# Altium PCB Inverter_540VDC.PcbDoc (part 2 of 2)
Units mm, origin at the board's own origin, x right, y up, seen from the top; angles counter-clockwise.
Board outline 400.26 x 240.24 mm, 2 copper layers (Top Layer, Bottom Layer), stack 2.071 mm thick; 193 components, 91 nets, 517 pads, 367 vias.
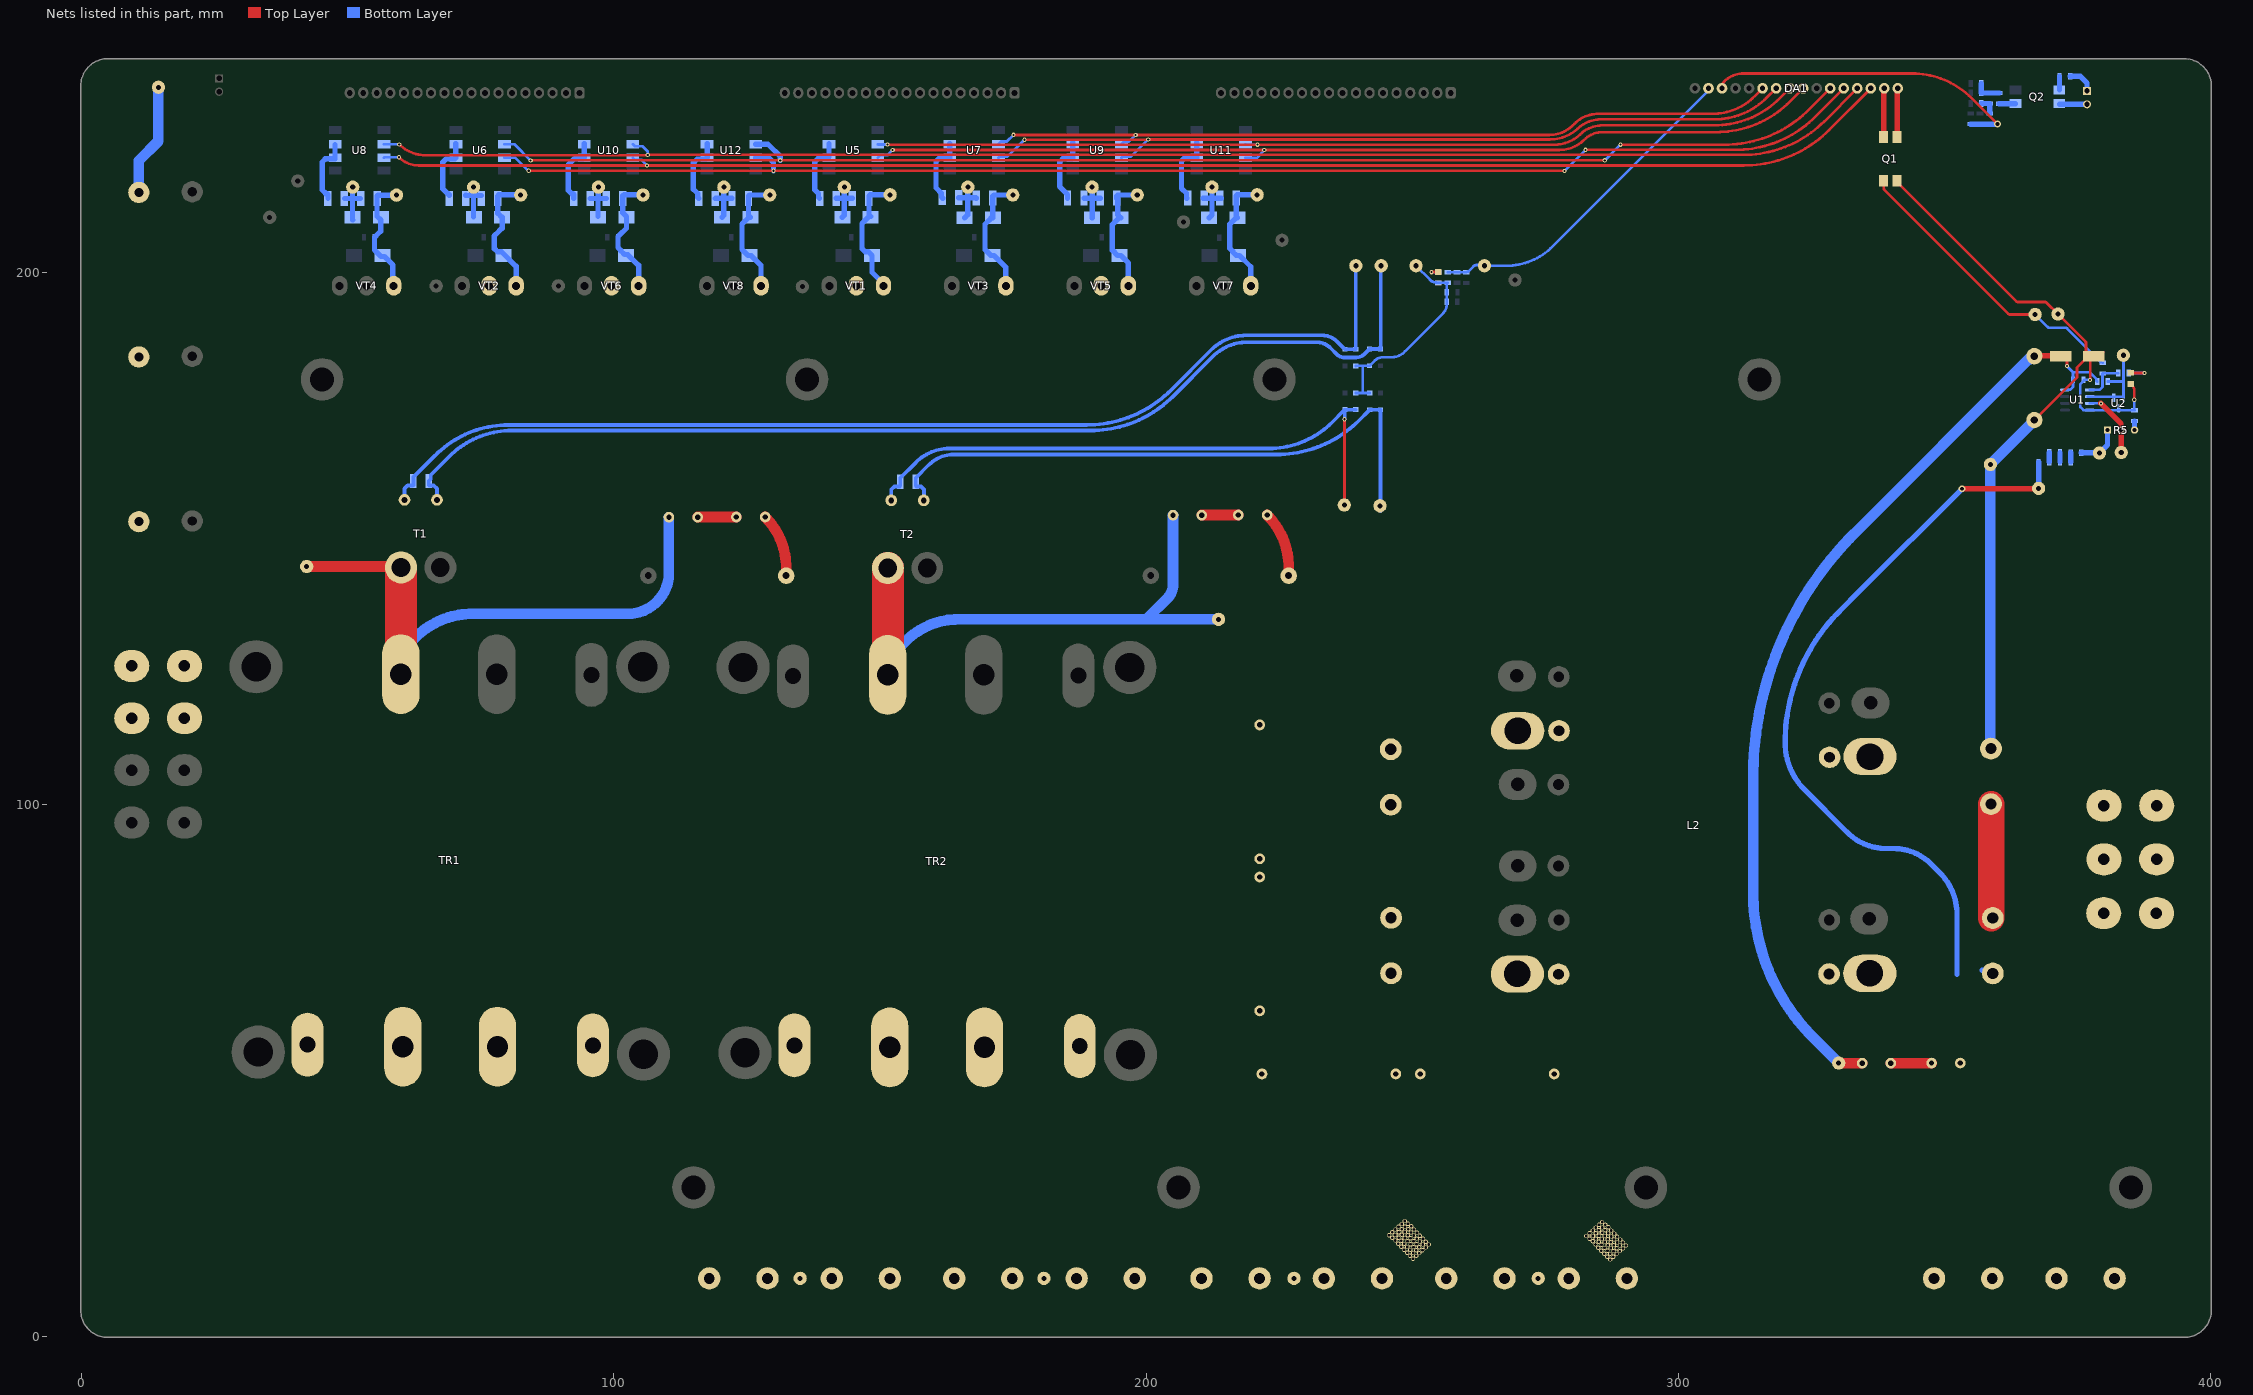
[diagram p2: the nets of this part, all layers, seen from the top]

## Via types
v1: diameter 0.8, hole 0.5, Top Layer to Bottom Layer, 324 vias
v2: diameter 0.8, hole 0.4, Top Layer to Bottom Layer, 37 vias
v3: diameter 1.27, hole 0.711, Top Layer to Bottom Layer, 6 vias

## Nets (pads, with @x,y where several pads share a name; then routed paths per layer and width w, separated by ;. In a path a pad name is that pad's centre, name@x,y a point inside that pad or via, vN(x,y) a via of type N, cw(c..) or ccw(c..) an arc to the next point about the centre after c; other vN are vias at no path point) (continued)
GND_II: C1.2 C2.1 C20.2 D1.2 L2.2 Q1.2 R7.2 TP8.1 TP9.1 U1.4 U2.3 VD1.2 VD5.1 | length 161.7
  Top Layer w0.5: Q1.2@341.163,216.862 341.67,216.355 363.455,194.57 ccw(c363.807,194.925) 363.805,194.425 368.843,194.425 cw(c368.843,193.925) 369.196,194.279 TP8.1@371.325,192.15 376.45,187.025 cw(c376.096,186.672) 376.596,186.672 376.596,184.995 C1.2@377.346,184.245 ; VD1.2@366.9,172.25 374.9,180.25 374.9,182.092 377.053,184.245 C1.2@377.346,184.245 ; v2(377.35,179.75) 377.35,183.795 C1.2@377.8,184.245 ; C1.2@379.82,184.995 378.803,184.995 C1.2@378.053,184.245 C1.2@377.8,184.245 ; D1.2@384.955,179.02 385.305,178.72 385.463,178.474 cw(c384.46,177.825) 385.655,177.825 385.655,177.475 v2(385.655,176.045) ; C1.2@377.346,184.245 C1.2@377.8,184.245
  Bottom Layer w0.5: C20.2@358.687,110.552 C20.2@358.725,110.514 ; C2.1@376.13,179.595 375.525,178.99 375.525,174.675 376.095,174.105 382.656,174.105 U2.3@382.715,174.164 ; C2.1@376.218,179.732 376.27,179.785 377.315,179.785 v2(377.35,179.75) ; U2.3@382.774,174.07 R7.2@385.68,174.07 385.668,174.083 385.668,176.032 v2(385.655,176.045)
  Bottom Layer w2: C20.2@358.625,110.614 TP9.1@358.625,163.9 366.9,172.175 VD1.2@366.9,172.25
NetC1_1: C1.1 C2.2 R2.2 R3.1 TP1.1 U1.8 VD1.1 | length 181.5
  Top Layer w0.5: TP1.1@330.125,51.45 TP1.1@330.137,51.438 ; R3.1@334.512,51.438 R3.1@334.525,51.425 ; C1.1@371.78,184.295 C1.1@371.83,184.245 372.25,184.245 373,183.495 v2(373,182.4)
  Top Layer w1: VD1.1@366.105,184.295 C1.1@371.78,184.295
  Top Layer w2: TP1.1@330.137,51.438 R3.1@334.512,51.438
  Bottom Layer w0.5: U1.8@372.654,177.915 372.662,177.923 373.599,177.923 374.13,178.454 C2.2@374.13,179.82 374.13,181.22 ; v2(373,182.4) 373,182.35 374.13,181.22 ; R2.2@378.68,179.47 378.53,179.62 378.53,179.92 377.23,181.22 374.13,181.22
  Bottom Layer w2: TP1.1@330.125,51.45 325.385,56.19 cw(c352.727,83.546) 314.05,83.546 314.05,104.968 cw(c379.13,104.968) 333.114,150.989 365.825,183.7 366.129,183.7 366.679,184.25 VD1.1@366.9,184.25
NetC17_1: C17.1 C18.2 C21.1 C22.2 C23.1 C27.2 J2.1 TR1.6 TR1.7 TR2.6 TR2.7
NetC17_2: C17.2 C18.1 C23.2 L2.8 VD3.1 VD6.1 VD8.1 VD10.1
  other v1: 250.15,14.7 250.75,15.225 249.575,15.25 251.35,15.75 250.175,15.775 249.05,15.825 250.775,16.3 251.925,16.3 249.65,16.35 248.475,16.375 252.55,16.8 251.35,16.85 250.25,16.875 249.075,16.9 247.925,16.95 251.975,17.35 253.125,17.35 249.675,17.425 250.825,17.425 248.525,17.475 247.375,17.525 252.55,17.9 251.45,17.925 250.25,17.975 249.125,18 247.975,18.05 246.85,18.125 250.875,18.475 252.025,18.475 249.7,18.55 248.575,18.575 246.25,18.625 247.45,18.65 251.45,19.025 250.325,19.05 245.65,19.125 249.15,19.125 246.85,19.15 248.05,19.175 250.9,19.6 249.775,19.625 246.25,19.65 247.45,19.675 248.625,19.725 246.85,20.175 250.35,20.175 248.025,20.225 249.25,20.225 247.425,20.725 248.65,20.725 249.825,20.775 248.05,21.225 249.225,21.275 248.625,21.775
NetC19_2: C19.2 C20.1 | length 21.5
  Top Layer w5: C19.2@358.787,78.695 C20.1@358.787,100.038
  Bottom Layer w1: C20.1@358.725,100.1 C20.1@358.787,100.038 ; C19.2@359.012,78.763 C19.2@359.075,78.7
NetC21_2: C21.2 C22.1 C27.1 L2.6 VD4.3 VD7.3 VD9.3 VD11.3
  other v1: 287.2,14.525 286.625,15.075 287.8,15.05 288.4,15.575 287.225,15.6 286.1,15.65 287.825,16.125 288.975,16.125 286.7,16.175 285.525,16.2 289.6,16.625 288.4,16.675 287.3,16.7 286.125,16.725 284.975,16.775 289.025,17.175 290.175,17.175 286.725,17.25 287.875,17.25 285.575,17.3 284.425,17.35 289.6,17.725 288.5,17.75 287.3,17.8 286.175,17.825 285.025,17.875 283.9,17.95 287.925,18.3 289.075,18.3 286.75,18.375 285.625,18.4 283.3,18.45 284.5,18.475 288.5,18.85 287.375,18.875 282.7,18.95 286.2,18.95 283.9,18.975 285.1,19 287.95,19.425 286.825,19.45 283.3,19.475 284.5,19.5 285.675,19.55 283.9,20 287.4,20 285.075,20.05 286.3,20.05 284.475,20.55 285.7,20.55 286.875,20.6 285.1,21.05 286.275,21.1 285.675,21.6
NetC28_2: C28.2 DA1.3 R30.2 R37.2 | length 61.4
  Top Layer w0.5: DA1.3@308.213,234.551 DA1.3@308.205,234.55 308.2,234.711 cw(c309.817,234.759) 308.695,235.925 cw(c312.25,232.205) 312.25,237.35 343.913,237.35 cw(c343.913,221.568) 355.074,232.726 v3(359.95,227.85)
  Bottom Layer w0.5: R37.2@354.939,227.85 R37.2@354.951,227.838 ; R30.2@358.462,227.838 R30.2@358.475,227.825 R30.2@358.487,227.837 ; v3@359.937,227.837 v3(359.95,227.85)
  Bottom Layer w1: R37.2@354.951,227.838 R30.2@358.462,227.838 ; R30.2@358.487,227.837 v3@359.937,227.837
NetC29_2: C29.2 R31.1 R32.2 R38.1 | length 5.2
  Bottom Layer w1: C29.2@356.925,235.475 R38.1@356.925,233.7 356.938,233.688 360.288,233.688 R32.2@360.3,233.675
NetC30_2: C30.2 R30.1 R31.2 | length 3.5
  Bottom Layer w1: C30.2@356.925,231.7 R31.2@358.5,231.7 358.487,231.687 358.487,229.838 R30.1@358.475,229.825
NetC31_1: C31.1 R8.2 | length 12.5
  Top Layer w2: R8.2@222.75,154.4 222.756,154.394 cw(c212.963,144.613) 226.804,144.613 C31.1@226.804,143
NetC32_1: C32.1 R9.2 | length 12.1
  Top Layer w2: R9.2@128.45,154.025 128.455,154.02 cw(c118.904,144.479) 132.404,144.479 C32.1@132.404,143
NetC33_1: C33.1 C34.1 D8.2 D12.2 D14.2 D16.2 R55.1 R58.2 TP47.1 | length 41.2
  Bottom Layer w0.5: D16.2@239.375,177.35 D16.2@239.4,177.35 239.413,177.338 240.713,177.338 ; D12.2@239.4,182.4 239.412,182.413 240.7,182.413 ; D8.2@242,182.425 242.025,182.425 242.225,182.625 242.225,182.65 242.992,183.417 cw(c244.46,181.95) 244.46,184.025 245.979,184.025 245.981,184.025 ccw(c245.981,187.813) 248.661,185.136 255.716,192.191 ccw(c253.827,194.082) 256.5,194.075 256.5,194.45 C34.1@256.5,196.25 ; D8.2@242.013,182.413 240.7,182.413 ; D14.2@242.05,177.325 D14.2@242.025,177.325 242.013,177.338 240.713,177.338 ; TP47.1@250.725,201.225 253.319,198.631 253.466,198.484 ccw(c254.423,199.442) 254.422,198.087 254.55,198.088 R58.2@254.925,198.025 R55.1@256.625,198.025 ; C34.1@256.475,196.25 256.475,197.875 R55.1@256.625,198.025 ; R55.1@256.675,198.025 R55.1@256.625,198.025 ; 240.7,182.413 240.7,177.35 240.713,177.338
NetC35_2: C35.2 DA1.2 R55.2 R59.2 TP48.1 | length 62.4
  Bottom Layer w0.5: R55.2@256.675,200.025 256.688,200.013 258.425,200.013 260.163,200.013 R59.2@260.175,200 260.55,200.15 261.512,201.112 cw(c262.158,200.465) 262.158,201.379 TP48.1@263.465,201.379 ; TP48.1@263.575,201.225 267.66,201.225 267.661,201.225 ccw(c267.661,213.547) 276.375,204.835 DA1.2@305.615,234.075
NetD1_1: D1.1 R6.2 | length 5.6
  Top Layer w0.5: D1.1@384.955,181.12 384.98,181.095 387.53,181.095 v2@387.555,181.07
  Bottom Layer w0.5: R6.2@384.63,181.07 384.643,181.082 387.568,181.082 v2(387.58,181.095)
NetD3_1: D3.1 R28.2 R33.2 TP26.1 | length 8.9
  Bottom Layer w1: R33.2@141.776,213.9 143.312,213.9 ; D3.1@142.944,210.325 143.312,210.694 143.312,213.9 ; TP26.1@143.325,216 143.312,215.988 143.312,213.9 ; R28.2@144.849,213.9 143.312,213.9
NetD3_2: D3.2 R28.1 R34.2 TP27.1 VD12.1 VT1.1 | length 23.8
  Bottom Layer w1: VD12.1@148.534,202.95 148.534,200 150.68,197.854 VT1.1@150.68,197.454 ; VD12.1@148.534,203.15 147.834,203.85 147.236,203.85 146.65,204.436 R34.2@146.65,206.575 146.65,209.147 147.978,210.475 148.278,210.475 147.951,210.802 147.951,214.348 148.153,214.55 TP27.1@151.925,214.55
NetD4_1: D4.1 R29.2 R35.2 TP28.1 | length 8.6
  Bottom Layer w1: R35.2@72.201,214.45 72.213,214.437 73.663,214.437 ; D4.1@73.663,210.378 73.663,214.437 ; TP28.1@73.675,216 73.663,215.988 73.663,214.437 ; R29.2@75.124,214.425 75.112,214.437 73.663,214.437
NetD4_2: D4.2 R29.1 R36.2 TP29.1 VD13.1 VT2.1 | length 25.9
  Bottom Layer w1: R36.2@77.575,206.7 R36.2@77.575,206.575 77.575,204.436 78.161,203.85 78.934,203.85 81.68,201.104 VT2.1@81.68,197.454 ; R36.2@77.575,206.825 77.675,206.925 77.675,206.95 77.775,207.05 77.8,207.05 79.036,208.286 79.036,210.386 79.05,210.4 78.926,210.4 78.226,211.1 78.226,214.348 78.428,214.55 82.244,214.55 TP29.1@82.925,214.55 ; TP29.1@82.244,214.263 81.981,214 TP29.1@82.781,214
NetD5_1: D5.1 R39.2 R41.2 TP31.1 | length 9.4
  Bottom Layer w1: R41.2@164.799,214.026 164.85,213.976 166.513,213.976 ; D5.1@165.916,210.225 166.513,210.822 166.513,213.976 ; TP31.1@166.525,216 166.513,215.988 166.513,213.976 ; R39.2@168.124,213.925 168.074,213.976 166.513,213.976
NetD5_2: D5.2 R39.1 R42.2 TP30.1 VD14.2 VT3.1 | length 23.4
  Bottom Layer w1: R39.1@171.226,213.925 171.238,213.913 171.238,210.237 D5.2@171.25,210.225 170.95,210.225 169.75,209.025 169.75,204.25 170.85,203.15 171.45,203.15 173.68,200.92 VT3.1@173.68,197.454 ; R39.1@171.226,214.036 171.226,214.323 171.428,214.525 TP30.1@174.975,214.525
NetD6_1: D6.1 R40.2 R43.2 TP33.1 | length 9.2
  Bottom Layer w1: R43.2@49.426,213.875 50.938,213.875 ; D6.1@50.969,209.825 50.938,209.856 50.938,213.875 ; TP33.1@50.975,216 50.938,215.962 50.938,213.875 ; R40.2@52.449,213.875 50.938,213.875
NetD6_2: D6.2 R40.1 R44.2 TP32.1 VD15.2 VT4.1 | length 23.2
  Bottom Layer w1: D6.2@56.251,209.825 55.551,210.525 55.551,214.298 55.753,214.5 TP32.1@59.2,214.5 ; D6.2@56.303,209.825 56.211,209.733 56.211,207.711 55.3,206.8 55.275,206.8 55.175,206.7 55.175,206.675 R44.2@55.075,206.575 55.075,204.2 56.325,202.95 56.925,202.95 58.508,201.367 58.508,197.626 VT4.1@58.68,197.454
NetD7_2: D7.2 D8.1 R45.2 T1.3 TP34.1 | length 209.8
  Bottom Layer w0.7: T1.3@66.798,157.25 66.798,159.361 66.212,159.947 65.378,159.947 65.276,160.049 R45.2@65.276,160.8 65.628,161.152 65.628,161.928 69.107,165.407 cw(c80.858,153.658) 80.858,170.275 189.586,170.275 189.587,170.275 ccw(c189.587,192.154) 205.06,176.685 212.556,184.181 cw(c219.057,177.683) 219.057,186.875 231.953,186.875 231.957,186.875 cw(c231.956,182.966) 234.719,185.731 234.722,185.728 235.875,184.575 235.877,184.572 ccw(c237.26,185.955) 237.26,184 237.261,184 239.453,184 239.455,184 ccw(c239.455,186.281) 241.068,184.668 241.775,185.375 D8.1@242,185.575 D7.2@244.05,185.575 244.113,185.638 TP34.1@244.113,201.225
NetD9_1: D9.1 R46.2 R48.2 TP37.1 | length 9.2
  Bottom Layer w1: R48.2@188.351,213.925 189.875,213.925 ; TP37.1@189.875,216.35 189.875,213.925 ; D9.1@189.891,210.225 189.875,210.241 189.875,213.925 ; R46.2@191.399,213.925 189.875,213.925
NetD9_2: D9.2 R46.1 R50.2 TP38.1 VD16.2 VT5.1 | length 23.4
  Bottom Layer w1: R46.1@194.5,213.925 194.702,213.723 194.702,210.748 D9.2@195.225,210.225 194.925,210.225 193.675,208.975 R50.2@193.675,206.55 193.675,204.153 194.678,203.15 VD16.2@194.978,203.15 195.278,203.15 196.68,201.748 VT5.1@196.68,197.454 ; R46.1@194.5,214.036 194.5,214.323 194.702,214.525 TP38.1@198.35,214.525
NetD10_1: D10.1 R47.2 R51.2 TP39.1 | length 9
  Bottom Layer w1: R51.2@95.626,213.875 97.066,213.875 ; D10.1@97.066,210.475 97.066,213.875 ; TP39.1@97.125,216.45 97.125,213.934 97.066,213.875 ; R47.2@98.624,213.875 97.066,213.875
NetD10_2: D10.2 R47.1 R53.2 TP40.1 VD17.2 VT6.1 | length 23.6
  Bottom Layer w1: R53.2@100.8,206.675 R53.2@100.8,206.575 100.8,204.65 101.328,204.122 101.328,204.05 102.028,203.35 102.628,203.35 104.68,201.298 VT6.1@104.68,197.454 ; R53.2@100.8,206.7 101.668,207.568 101.693,207.568 102.4,208.275 D10.2@102.4,210.325 102.4,210.475 101.725,211.15 101.725,214.37 101.927,214.573 TP40.1@105.463,214.573
NetD11_2: D11.2 D12.1 R45.1 T1.4 TP41.1 | length 208
  Bottom Layer w0.7: T1.4@60.702,157.25 60.702,159.361 61.288,159.947 62.272,159.947 62.374,160.049 R45.1@62.374,160.8 62.374,161.551 62.727,161.903 62.753,161.903 66.454,165.604 cw(c80.264,151.796) 80.264,171.325 80.266,171.325 188.849,171.325 188.85,171.325 ccw(c188.85,193.777) 204.727,177.902 212.261,185.436 cw(c218.811,178.89) 218.811,188.15 233.132,188.15 cw(c233.13,184.238) 235.898,187.002 237.125,185.775 237.125,185.75 237.325,185.55 D11.2@237.35,185.55 D12.1@239.4,185.55 TP41.1@239.4,201.225
NetD13_2: D13.2 D14.1 R54.2 T2.3 TP42.1 | length 115.8
  Bottom Layer w0.7: T2.3@158.248,157.15 158.313,157.215 158.313,159.186 157.727,159.772 156.853,159.772 156.751,159.874 R54.2@156.751,160.625 156.751,161.376 159.201,163.826 cw(c163.904,159.126) 163.904,165.775 224.544,165.775 ccw(c224.544,187.698) 224.546,165.775 ccw(c224.544,187.698) 240.048,172.198 241.8,173.95 241.8,173.975 242,174.175 D14.1@242.025,174.175 D13.2@244.075,174.175 ; TP42.1@244.05,155.15 D13.2@244.05,174.15
NetD15_2: D15.2 D16.1 R54.1 T2.4 TP53.1 | length 112.9
  Top Layer w0.5: TP53.1@237.3,156.275 v2@237.3,172.375
  Bottom Layer w0.7: T2.4@152.152,157.15 152.152,159.186 152.738,159.772 153.747,159.772 153.849,159.874 R54.1@153.849,160.625 153.849,161.376 156.765,164.291 cw(c163.061,157.997) 163.061,166.9 223.078,166.9 223.08,166.9 ccw(c223.08,183.727) 234.98,171.83 D15.2@237.125,173.975 ; v2(237.275,172.4) 237.312,172.438 237.312,173.975 237.312,174.188 237.325,174.2 D15.2@237.35,174.2 D16.1@239.4,174.2
NetD17_1: D17.1 R56.2 R60.2 TP49.1 | length 10
  Bottom Layer w1: R60.2@210.751,213.925 212.4,213.925 ; D17.1@211.866,210.225 212.4,210.759 212.4,213.925 ; TP49.1@212.4,216.625 212.4,213.925 ; R56.2@214.124,213.925 R56.2@213.824,213.925 212.4,213.925
NetD17_2: D17.2 R56.1 R61.2 TP50.1 VD18.2 VT7.1 | length 23.8
  Bottom Layer w1: VT7.1@219.68,197.454 219.68,201.045 217.575,203.15 216.975,203.15 216.275,203.85 216.275,203.95 215.75,204.475 R61.2@215.75,206.5 215.75,209.075 216.9,210.225 D17.2@217.2,210.225 216.926,210.499 216.926,214.348 217.128,214.55 TP50.1@220.875,214.55
NetD18_1: D18.1 R57.2 R62.2 TP51.1 | length 9
  Bottom Layer w1: R62.2@119.101,213.875 119.113,213.887 120.675,213.887 ; D18.1@120.344,210.325 120.675,210.656 120.675,213.887 ; TP51.1@120.7,216 120.675,215.975 120.675,213.887 ; R57.2@122.224,213.9 122.212,213.887 120.675,213.887
NetD18_2: D18.2 R57.1 R63.2 TP52.1 VD19.2 VT8.1 | length 23.8
  Bottom Layer w1: VT8.1@127.68,197.454 127.68,201.298 125.828,203.15 VD19.2@125.528,203.15 125.228,203.15 124.1,204.278 R63.2@124.1,206.575 124.1,209.047 125.378,210.325 D18.2@125.678,210.325 125.326,210.677 125.326,214.323 125.528,214.525 TP52.1@129.325,214.525
NetD19_1: D19.1 R58.1 | length 2.6
  Top Layer w0.5: v2(253.65,200.025) 253.675,200.05 254.9,200.05 D19.1@254.925,200.075
  Bottom Layer w0.5: v2(253.65,200.025) R58.1@254.925,200.025
NetDA1_6: DA1.6 U7.2 U9.2 | length 150.3
  Top Layer w0.5: v2(175.1,225.825) 175.125,225.8 v2(198.05,225.8) 275.792,225.8 ccw(c275.794,232.032) 280.202,227.627 280.455,227.88 cw(c285.026,223.314) 285.026,229.775 306.363,229.775 306.365,229.775 ccw(c306.365,241.086) 314.364,233.089 DA1.6@315.825,234.55
  Bottom Layer w0.5: U7.2@172.272,224.053 172.784,224.565 173.84,224.565 v2(175.1,225.825) ; U9.2@195.397,224.053 195.909,224.565 196.815,224.565 v2(198.05,225.8)
NetDA1_7: DA1.7 U7.3 U9.3 | length 156.7
  Top Layer w0.5: v2(177.175,224.9) 200.375,224.9 v2(200.425,224.95) 275.824,224.95 ccw(c275.826,232.846) 281.408,227.262 cw(c283.47,225.202) 281.85,227.625 cw(c285.222,222.582) 282.901,228.187 cw(c285.732,221.353) 285.733,228.75 306.849,228.75 306.851,228.75 ccw(c306.851,242.545) 316.607,232.792 DA1.7@318.365,234.55
  Bottom Layer w0.5: U7.3@172.272,221.513 172.438,221.679 173.929,221.679 177.15,224.9 v2(177.175,224.9) ; U9.3@195.397,221.513 195.563,221.679 197.129,221.679 200.4,224.95 v2(200.425,224.95)
NetDA1_8: DA1.8 U5.2 U11.2 | length 176.7
  Top Layer w0.5: v2(151.425,224) 151.45,223.975 v2(220.95,223.975) 220.975,223.95 276.486,223.95 ccw(c276.488,231.599) 281.895,226.189 cw(c284.612,223.477) 283.145,227.024 cw(c286.167,219.722) 286.167,227.625 306.86,227.625 306.861,227.625 ccw(c306.861,244.811) 319.015,232.66 DA1.8@320.905,234.55
  Bottom Layer w0.5: U5.2@149.597,224.053 149.65,224 v2(151.425,224) ; U11.2@218.675,224.053 218.753,223.975 v2(220.95,223.975)
NetDA1_9: DA1.9 U5.3 U11.3 | length 182.1
  Top Layer w0.5: v2(152.4,222.95) 152.425,222.975 v2(222.2,222.975) 277.667,222.975 277.669,222.975 ccw(c277.669,229.569) 282.332,224.907 cw(c285.754,221.486) 285.754,226.325 307.072,226.325 307.073,226.325 ccw(c307.073,245.993) 320.982,232.087 DA1.9@323.445,234.55
  Bottom Layer w0.5: U5.3@149.597,221.513 150.109,222.025 151.475,222.025 v2(152.4,222.95) ; U11.3@218.675,221.513 220.813,221.513 222.2,222.9 v2(222.2,222.975)
NetDA1_11: DA1.11 U6.2 U12.2 | length 261.2
  Top Layer w0.5: v2(84.4,221) 84.425,221.025 v2(286.175,221.025) ; v2(289.125,223.975) 308.67,223.975 ccw(c308.67,246.378) 324.514,230.539 DA1.11@328.525,234.55
  Bottom Layer w0.5: U6.2@79.497,224.053 81.322,224.053 84.375,221 v2(84.4,221) ; v2(286.175,221.025) v2(289.125,223.975)
  Bottom Layer w1: U12.2@126.697,224.053 128.972,224.053 131.3,221.725 v2(131.3,221.025)
NetDA1_12: DA1.12 U6.3 U12.3 | length 263.3
  Top Layer w0.5: v2(84.05,219.075) v2(130.025,219.075) 130.05,219.05 v2(278.6,219.05) ; v2(282.575,223) 310.705,223 ccw(c310.705,244.268) 325.746,229.231 DA1.12@331.065,234.55
  Bottom Layer w0.5: U6.3@79.497,221.513 81.531,221.513 83.344,219.7 83.969,219.075 v2(84.05,219.075) ; v2(278.6,219.05) 278.625,219.05 v2(282.575,223)
  Bottom Layer w1: U12.3@126.697,221.513 129.137,221.513 130.025,220.625 v2(130.025,219.075)
NetDA1_13: DA1.13 U8.2 U10.2 | length 285.5
  Top Layer w0.5: v2(59.725,224.025) ccw(c64.614,228.914) 64.614,222 64.615,222 v2@106.35,222 ; v2(106.4,222.05) 312.175,222.05 ccw(c312.177,243.604) 327.422,228.367 DA1.13@333.605,234.55
  Bottom Layer w0.5: U8.2@56.85,224.053 56.878,224.025 v2(59.725,224.025) ; U10.2@103.597,224.053 103.971,223.679 105.396,223.679 106.399,222.676 v2(106.4,222.05)
NetDA1_14: DA1.14 U8.3 U10.3 | length 288
  Top Layer w0.5: v2(59.65,221.6) ccw(c63.332,225.282) 63.332,220.075 63.333,220.075 v2(106.275,220.075) 312.282,220.075 312.284,220.075 ccw(c312.284,242.736) 328.309,226.714 DA1.14@336.145,234.55
  Bottom Layer w0.5: U8.3@56.85,221.513 56.937,221.6 v2(59.65,221.6) ; U10.3@103.597,221.513 103.988,221.122 105.228,221.122 v2(106.275,220.075)
NetDA1_15: DA1.15 Q1.4 | length 9.7
  Top Layer w0.5: DA1.15@338.685,234.34 DA1.15@338.685,234.55
  Top Layer w1: Q1.4@338.605,225.1 338.605,234.47 DA1.15@338.685,234.55
NetDA1_16: DA1.16 Q1.3 | length 9.2
  Top Layer w1: Q1.3@341.145,225.4 341.145,234.47 DA1.16@341.225,234.55
NetJ1_1: J1.1 VD2.1
NetJ3_1: J3.1 VD5.3
NetP1_1: P1.1 R27.1 | length 5.2
  Bottom Layer w1: R27.1@373.6,236.8 375.55,236.8 376.775,235.575 P1.1@376.775,234.095
NetP1_2: P1.2 Q2.2 | length 5.3
  Bottom Layer w0.5: Q2.2@371.55,231.68 Q2.2@371.675,231.555
  Bottom Layer w1: Q2.2@371.675,231.555 P1.2@376.775,231.555
NetQ1_1: Q1.1 R4.1 TP4.1 | length 56.1
  Top Layer w0.5: Q1.1@338.605,217.2 338.605,215.777 ccw(c339.105,215.777) 338.751,215.424 361.955,192.22 ccw(c362.307,192.575) 362.305,192.075 TP4.1@367.025,192.075
  Bottom Layer w0.5: TP4.1@367.025,192.075 369.379,189.721 369.38,189.72 ccw(c369.732,190.075) 369.732,189.575 372.693,189.575 cw(c372.693,189.075) 373.046,189.429 379.33,183.145 R4.1@379.705,182.995
NetQ2_1: Q2.1 R27.2 | length 2.6
  Bottom Layer w0.5: Q2.1@371.55,234.22 Q2.1@371.6,234.27
  Bottom Layer w1: Q2.1@371.6,234.27 R27.2@371.6,236.8
NetQ2_3: Q2.3 R32.1 | length 3.1
  Bottom Layer w0.5: Q2.3@363.345,231.675 Q2.3@363.35,231.68
  Bottom Layer w1: R32.1@360.3,231.675 Q2.3@363.345,231.675
NetR1_1: R1.1 R3.2 | length 7.6
  Top Layer w2: R3.2@339.925,51.425 R1.1@347.55,51.425
NetR2_1: R2.1 TP5.1 U1.2 U2.1 U2.2 | length 17.4
  Bottom Layer w0.5: U1.2@376.954,176.645 383.63,176.645 383.63,179.561 ; R2.1@380.68,179.47 383.539,179.47 383.63,179.561 ; TP5.1@383.605,184.42 383.63,184.395 383.63,179.561
NetR4_2: R4.2 R6.1 U1.1 | length 8.1
  Bottom Layer w0.5: U1.1@377.286,177.915 379.125,177.915 379.68,178.47 379.68,180.97 R4.2@379.705,180.995 379.73,181.02 382.58,181.02 R6.1@382.605,181.045
NetR5_1: R5.1 R26.1 TP2.1 | length 8.4
  Bottom Layer w1: R26.1@375.705,166.12 375.743,166.082 379.068,166.082 TP2.1@379.105,166.045 380.625,167.565 R5.1@380.625,170.37
NetR5_2: R5.2 TP3.1 U1.3 | length 12.9
  Top Layer w1: v2(379.38,175.37) 383.165,171.585 R5.2@383.165,170.37 383.185,170.35 383.185,166.165 TP3.1@383.205,166.145
  Bottom Layer w0.5: U1.3@377.286,175.375 377.288,175.372 379.378,175.372 v2(379.38,175.37)
NetR5_3: R5.3 R7.1 | length 1.7
  Bottom Layer w0.5: R7.1@385.68,172.07 R7.1@385.693,172.058 ; R5.3@385.693,170.382 R5.3@385.705,170.37
  Bottom Layer w1: R5.3@385.693,170.382 R7.1@385.693,172.058
NetR8_1: R8.1 R10.1 | length 6.9
  Top Layer w2: R10.1@210.45,154.4 R8.1@217.35,154.4
NetR9_1: R9.1 R11.1 | length 7.3
  Top Layer w2: R11.1@115.775,154 115.8,154.025 R9.1@123.05,154.025
NetR10_2: R10.2 T2.1 TP44.1 TR2.3 | length 109.6
  Top Layer w1: TR2.3@151.481,124.375 TR2.3@151.49,124.384 ; T2.1@151.49,144.441 T2.1@151.5,144.45
  Top Layer w6: TR2.3@151.49,124.384 T2.1@151.49,144.441
  Bottom Layer w0.5: 204.025,138.775 204.575,138.775
  Bottom Layer w2: TR2.3@151.481,124.375 151.481,127.331 154.879,130.729 cw(c164.707,120.901) 164.707,134.8 200.35,134.8 ; R10.2@205.075,154.375 205.075,141.31 cw(c201.49,141.31) 204.025,138.775 200.35,135.1 200.35,134.8 ; TP44.1@213.625,134.8 200.35,134.8
NetR11_2: R11.2 T1.1 TP46.1 TR1.3 | length 109.3
  Top Layer w2: TP46.1@42.325,144.725 59.875,144.725 T1.1@60.05,144.55
  Top Layer w6: TR1.3@60.006,124.5 T1.1@60.006,144.269
  Bottom Layer w2: TR1.3@60.006,124.5 60.006,128.681 62.699,131.374 cw(c73.505,120.568) 73.505,135.85 102.494,135.85 ccw(c102.67,143.553) 110.375,143.553 R11.2@110.375,154
NetR23_1: R23.1 R24.2 | length 1.8
  Bottom Layer w1: R23.1@369.68,164.345 R24.2@369.68,166.145
NetR24_1: R24.1 R25.2 | length 1.8
  Bottom Layer w0.5: R24.1@371.68,166.145 R24.1@371.693,166.132 ; R25.2@371.693,164.357 R25.2@371.705,164.345
  Bottom Layer w1: R25.2@371.693,164.357 R24.1@371.693,166.132
NetR25_1: R25.1 R26.2 | length 1.8
  Bottom Layer w1: R25.1@373.705,164.345 R26.2@373.705,166.12
NetR33_1: R33.1 U5.6 U5.7 | length 12.8
  Bottom Layer w1: R33.1@138.674,213.9 138.472,214.102 138.472,214.803 137.75,215.525 137.75,220.725 138.425,221.4 140.2,221.4 140.453,221.653 U5.7@140.453,224.193
NetR35_1: R35.1 U6.6 U6.7 | length 11.8
  Bottom Layer w1: R35.1@69.099,214.45 69.099,214.576 68.897,214.778 68.771,214.778 67.9,215.649 67.9,220.711 68.486,221.297 70.137,221.297 U6.6@70.353,221.513 ; U6.6@70.353,221.975 U6.7@70.353,224.143
NetR41_1: R41.1 U7.6 U7.7 | length 13
  Bottom Layer w1: R41.1@161.799,213.925 161.597,214.127 161.597,214.828 160.55,215.875 160.55,220.836 161.136,221.422 163.037,221.422 U7.6@163.128,221.513 ; U7.6@163.037,221.562 163.128,221.653 U7.7@163.128,224.193
NetR43_1: R43.1 U8.6 U8.7 | length 12.7
  Bottom Layer w1: R43.1@46.324,213.875 46.324,214.576 46.122,214.778 45.922,214.778 45.25,215.45 45.25,220.714 45.836,221.3 47.609,221.3 47.65,221.341 U8.7@47.65,223.986
NetR48_1: R48.1 U9.6 U9.7 | length 12.9
  Bottom Layer w1: R48.1@185.249,213.925 185.249,214.626 183.775,216.1 183.775,220.736 184.361,221.322 186.062,221.322 U9.6@186.253,221.513 ; U9.6@186.124,221.674 186.253,221.803 U9.7@186.253,224.343
NetR51_1: R51.1 U10.6 U10.7 | length 13
  Bottom Layer w1: R51.1@92.524,213.875 92.524,214.576 92.322,214.778 92.111,214.778 91.45,215.439 91.45,220.15 92.641,221.341 94.191,221.341 94.453,221.603 U10.7@94.453,224.143
NetR60_1: R60.1 U11.6 U11.7 | length 13
  Bottom Layer w1: R60.1@207.649,213.925 207.595,213.979 207.595,214.843 206.675,215.763 206.675,220.927 207.261,221.513 U11.6@209.531,221.513 ; U11.6@209.531,221.843 U11.7@209.531,224.383
NetR62_1: R62.1 U12.6 U12.7 | length 12.7
  Bottom Layer w1: R62.1@115.999,213.875 115.797,214.077 115.797,214.778 114.975,215.6 114.975,220.55 115.704,221.279 117.229,221.279 117.553,221.603 U12.7@117.553,224.143
NetTP18_1: TP18.1 TR1.5 VD3.3 VD4.1
NetTP21_1: TP21.1 TR1.8 VD6.3 VD7.1
NetTP22_1: TP22.1 TR2.5 VD8.3 VD9.1
NetTP25_1: TP25.1 TR2.8 VD10.3 VD11.1
V_BAT: C24.1 C25.1 C26.1 J4.1 J5.1 TP23.1 VT1.2 VT2.2 VT5.2 VT6.2 | length 21.3
  Bottom Layer w2: C25.1@10.792,214.998 10.792,220.967 14.475,224.65 TP23.1@14.475,234.75
"VCC +540": C19.1 L2.4 R1.2 R23.2 TP16.1 VD2.3 | length 142.4
  Top Layer w1: v3(353.275,159.325) TP16.1@367.725,159.325
  Bottom Layer w1: 352.35,68.075 352.35,79.362 352.35,79.365 ccw(c341.218,79.364) 349.091,87.234 349.087,87.238 347.492,88.832 347.49,88.835 ccw(c340.452,81.796) 340.452,91.75 339.069,91.75 339.066,91.75 cw(c339.066,102.11) 331.741,94.784 331.738,94.787 323.688,102.837 cw(c332.443,111.592) 320.061,111.595 cw(c355.113,111.592) 330.329,136.379 334.069,140.119 v3(353.275,159.325) ; 357.046,68.879 358.482,68.879 C19.1@359.075,68.286 ; R23.2@367.655,164.37 R23.2@367.68,164.345 367.678,164.342 367.678,159.403 TP16.1@367.675,159.4
pads on no net: L2.1 L2.3 L2.5 L2.7 L2.9 L2.10 Radiator_1.1 Radiator_2.1 TR1.1 TR1.4 TR1.9 TR1.10 TR1.11 TR1.12 TR2.1 TR2.4 TR2.9 TR2.10 TR2.11 TR2.12 U1.5 U1.6 U1.7 U3.5 U3.6 U3.7 U3.12 U3.13 U3.14 U4.5 U4.6 U4.7 U4.12 U4.13 U4.14 U5.1 U5.4 U6.1 U6.4 U7.1 U7.4 U8.1 U8.4 U9.1 U9.4 U10.1 U10.4 U11.1 U11.4 U12.1 U12.4 U13.5 U13.6 U13.7 U13.12 U13.13 U13.14

## Polygon pours and split planes (outlines as drawn)
NetC17_1 on Top Layer "NONET_L-01_P-001" (solid, pour order 1): 83.65,62.025 83.65,55.673 93.354,45.925 136.525,45.925 148.275,57.675 171.421,57.675 183.171,45.925 200.385,45.925 204.593,48.92 204.593,79.518 228.2,103.125 251.455,103.125 251.455,79.53 248.24,76.315 229.328,76.315 217.475,64.462 217.475,42.2 209.8,34.525 203.055,34.525 194.197,25.675 126.45,25.675 117.6,34.525 71.275,34.525 56.88,48.92 56.88,62.025
NetTP18_1 on Top Layer "NONET_L-01_P-001" (solid, pour order 0): 143.35,14.325 143.35,8.55 126.875,8.55 120.425,15 60.7,15 39.48,36.22 39.48,61.025 48.8,61.025 48.8,51.071 69.096,30.775 103.525,30.775 111.6,22.7 134.975,22.7
NetJ3_1 on Top Layer "NONET_L-01_P-001" (solid, pour order 34): 381.1,8.825 379.877,10.048 379.877,12.477 390.575,23.175 390.575,31.675 376.588,45.662 376.588,80.822 378.416,82.65 392.9,82.65 392.9,66.45 389.9,63.45 389.9,57.1 398.625,48.375 398.625,15.975 391.475,8.825
NetC17_1 on Top Layer "NONET_L-01_P-001" (solid, pour order 31): 376.5,96.725 393.325,96.725 393.325,108.45 353.925,147.85 263.225,147.85 250.725,135.35 250.725,107.286 243.125,99.686 243.125,76.325 250.675,76.325 261.275,86.925 261.275,122.9 268.75,130.375 348.675,130.375 376.5,102.55
GND_-18V_4 on Top Layer "NONET_L-01_P-001" (solid, pour order 24): 185.069,197.64 181.475,194.046 181.475,138.975 191.525,138.975 191.525,147.25 216.05,171.775 216.05,192.193 216.05,197.64 213.15,197.64 213.15,196.725 209.936,193.511 190.786,193.511 187.97,196.327 187.97,197.64
GND_-18V_6 on Top Layer "NONET_L-01_P-001" (solid, pour order 23): 93.07,197.454 90.725,195.109 90.725,139.1 100.679,139.1 100.679,149.054 124.05,172.425 124.05,197.454 121.15,197.454 121.15,196.275 118.2,193.325 99.05,193.325 95.97,196.405 95.97,197.454
GND_-18V_2 on Top Layer "NONET_L-01_P-001" (solid, pour order 26): 211.5,200.95 200.225,212.225 26.125,212.225 26.125,196.325 26.125,184.3 21.1,179.275 21.1,172.7 28.4,172.7 49.97,194.27 49.97,199.62 51.25,200.9 107.5,200.9 112.796,195.604 118.121,195.604 118.97,196.453 118.97,199.525 120.345,200.9 153.425,200.9 158.721,195.604 164.121,195.604 164.97,196.453 164.97,198.97 166.9,200.9 199.075,200.9 204.475,195.5 210.275,195.5 211.5,196.725
"VCC +540" on Top Layer "NONET_L-01_P-001" (solid, pour order 25): 359.864,13.067 357.167,13.067 351.175,7.075 345.85,7.075 343.5,9.425 343.5,20.025 361.175,37.7 361.175,69.36 358.707,71.827 327.932,71.827 325.457,69.352 325.457,66.993 330.273,62.177 345.982,62.177 351.557,56.602 351.557,49.407 327.932,25.782 327.932,10.152 337.382,0.702 357.782,0.702 361.05,3.97 361.05,11.881
GND_-18V_5 on Top Layer "NONET_L-01_P-001" (solid, pour order 22): 139.07,197.75 139.07,188.305 163.45,163.925 163.45,116.875 177.775,116.875 177.775,187.85 170.05,195.575 170.05,197.929 167.15,197.929 167.15,195.65 164.975,193.475 144.5,193.475 141.97,196.005 141.97,197.75
GND_-18V_1 on Top Layer "NONET_L-01_P-001" (solid, pour order 21): 52.15,197.854 52.15,177.7 71.85,158 71.85,117.072 87.625,117.072 87.625,180.775 72.97,195.43 72.97,197.454 70.07,197.454 70.07,195.42 67.65,193 57.525,193 55.05,195.475 55.05,197.854
GND_-18V_2 on Top Layer "NONET_L-01_P-001" (solid, pour order 20): 5.95,92.329 5.95,107.825 8.075,109.95 8.175,109.85 21.625,109.85 26.475,114.7 26.475,127.25 15.4,138.325 15.4,214.05 19.375,218.025 29.5,218.025 35.425,212.1 35.425,147.3 51.2,131.525 51.2,114.15 29.379,92.329
NetJ1_1 on Top Layer "NONET_L-01_P-001" (solid, pour order 14): 346.96,8.9 345.475,10.385 345.475,17.15 364.65,36.325 364.65,86.75 371.75,93.85 393.147,93.85 393.147,84.875 377.375,84.875 374.275,81.775 374.275,33.3 349.875,8.9
NetC17_2 on Top Layer "NONET_L-01_P-001" (solid, pour order 9): 259.3,10.55 257.475,8.725 253.7,8.725 219.8,42.625 219.8,62.025 230.025,72.25 277.3,72.25 280.075,69.475 280.05,69.45 280.05,66.05 277.05,63.05 239.2,63.05 230.725,54.575 230.725,45.825 259.3,17.25
NetC21_2 on Top Layer "NONET_L-01_P-001" (solid, pour order 3): 149.4,13.55 149.4,5.35 154,0.75 288.4,0.75 292.85,5.2 292.85,17.575 285.488,24.937 279.863,19.312 284.862,14.313 284.862,9.479 282.357,6.975 251.311,6.975 245.186,13.1 243.485,13.1 241.7,11.315 237.51,7.125 204.716,7.125 200.1,11.741 198.742,13.1 197.069,13.1 194.525,10.556 190.919,6.95 161.2,6.95 154.6,13.55 150.6,13.55
NetTP18_1 on Bottom Layer "NONET_L-01_P-001" (solid, pour order 33): 143.35,12.1 143.35,8.55 128.325,8.55 121.875,15 60.8,15 39.48,36.32 39.48,61 48.85,61 48.85,52.525 61.325,40.05 89.875,40.05 107.225,22.7 132.75,22.7
NetJ3_1 on Bottom Layer "NONET_L-01_P-001" (solid, pour order 32): 380.925,8.425 379.475,9.875 379.475,13.175 390.575,24.275 390.575,31.675 376.588,45.662 376.588,80.822 378.416,82.65 392.9,82.65 392.9,66.3 389.9,63.3 389.9,57.15 398.625,48.425 398.625,15.975 391.075,8.425
"VCC +540" on Bottom Layer "NONET_L-01_P-001" (solid, pour order 15): 359.873,13.1 357.175,13.1 351.175,7.1 345.8,7.1 343.55,9.35 343.55,18.95 361.1,36.5 361.1,69.25 358.375,71.975 328.1,71.975 325.5,69.375 325.5,66.5 329.825,62.175 346,62.175 351.575,56.6 351.575,49.2 328.1,25.725 328.1,10 337.25,0.85 358.075,0.85 361.1,3.875 361.1,11.873
GND_II on Bottom Layer "NONET_L-01_P-001" (solid, pour order 16): 325.8,110.375 329.7,114.275 367.4,114.275 374.225,107.45 374.225,8.7 369.475,8.7 363.2,14.975 363.2,101.425 360.125,104.5 328.15,104.5 325.8,106.85
GND_-18V_6 on Bottom Layer "NONET_L-01_P-001" (solid, pour order 27): 64.462,143.263 64.462,145.837 69.75,151.125 100.675,151.125 100.675,139.1 68.625,139.1
V_BAT on Bottom Layer "NONET_L-01_P-001" (solid, pour order 30): 51.875,177.475 47.85,173.45 12.45,173.45 12.45,159.9 14.425,157.925 52.175,157.925 75.65,181.4 75.65,185.55 54.15,185.55 51.875,183.275
V_BAT on Bottom Layer "NONET_L-01_P-001" (solid, pour order 29): 190.15,197.854 193.05,197.854 193.05,191.5 187.125,185.575 132.271,185.575 122.071,175.375 59.492,175.375 48.592,186.275 27.025,186.275 24,189.3 13,189.3 13,208.975 31.325,208.975 46.35,193.95 72.35,193.95 75.15,196.75 75.15,197.454 78.05,197.454 78.05,196.625 80.725,193.95 95.293,193.95 98.15,196.807 98.15,197.454 101.05,197.454 101.05,196.807 103.907,193.95 141.225,193.95 144.15,196.875 144.15,197.454 147.05,197.454 147.05,196.8 149.9,193.95 187.35,193.95 190.15,196.75
V_BAT on Bottom Layer "NONET_L-01_P-001" (solid, pour order 19): 22.725,114.6 20.825,112.7 7.025,112.7 3.55,116.175 3.55,212.65 8.75,217.85 12.6,217.85 16.675,213.775 16.675,150.95 22.725,144.9
GND_-18V_4 on Bottom Layer "NONET_L-01_P-001" (solid, pour order 28): 155.787,142.538 155.787,145.987 160.2,150.4 191.4,150.4 191.4,138.975 159.35,138.975
NetC17_1 on Bottom Layer "NONET_L-01_P-001" (solid, pour order 18): 233.175,74.436 233.175,59.925 245.375,47.725 252.325,47.725 253.9,49.3 253.9,54.4 242.125,66.175 242.125,70.877 248.1,76.852 248.1,79.588 246.888,80.8 239.539,80.8
NetTP21_1 on Bottom Layer "NONET_L-01_P-001" (solid, pour order 2): 90.55,60.9 90.55,43.625 100.175,34 117.925,34 127.151,24.774 133.751,24.774 142.4,16.125 166.55,16.125 173.9,8.775 189.064,8.775 189.064,12.011 175.35,25.725 144.8,25.725 125.825,44.7 104.35,44.7 99.074,49.976 99.074,60.9
NetC17_2 on Bottom Layer "NONET_L-01_P-001" (solid, pour order 4): 115.5,13.45 115.5,6.85 121.525,0.825 255.05,0.825 259.3,5.075 259.3,12.406 249.138,22.568 239.857,22.568 249.108,13.317 249.138,9.388 246.9,7.15 217.234,7.15 211.284,13.1 209.55,13.1 203.475,7.025 170.9,7.025 164.825,13.1 163.075,13.1 156.875,6.9 126.825,6.9 120.275,13.45
NetC21_2 on Bottom Layer "NONET_L-01_P-001" (solid, pour order 10): 292.625,8.975 292.575,8.925 289.1,8.925 257.525,40.5 257.525,56.125 250.925,62.725 250.925,100.975 245.95,105.95 223.45,105.95 217.7,111.7 217.7,116.25 219.075,117.625 248.875,117.625 262.975,103.525 262.975,66.425 286.175,43.225 286.175,24.875 292.625,18.425
NetC21_2 on Bottom Layer "NONET_L-01_P-001" (solid, pour order 11): 279.65,114.656 279.65,113.05 276.425,109.825 258.35,109.825 249.375,118.8 226.275,118.8 225.95,118.475 225.95,118.05 229.397,114.603 221.525,111.875 217.7,115.7 217.7,122.325 223.175,127.8 257.175,127.8 266.825,118.15 276.156,118.15
NetTP25_1 on Bottom Layer "NONET_L-01_P-001" (solid, pour order 6): 181.925,60.7 181.925,45 192.575,34.35 209.6,34.35 218.15,25.8 249.5,25.8 266.775,8.525 280,8.525 281.575,10.1 281.575,12.875 251.3,43.15 243.575,43.15 240.8,45.925 194.975,45.925 190.549,50.351 190.549,60.7
NetTP22_1 on Bottom Layer "NONET_L-01_P-001" (solid, pour order 5): 235.55,8.65 220.6,8.65 214.15,15.1 189.775,15.1 176.885,27.99 145.91,27.99 130.955,42.945 130.955,60.768 140.9,60.768 140.9,52 151.7,41.2 182.4,41.2 201,22.6 224.8,22.6 235.55,11.85

## Keep-outs
Keep-Out Layer:
  circle w0.254: c240,150 r1.27
  circle w0.254: c395,150 r1.27
  circle w0.254: c40,150 r1.27
  circle w0.254: c280,235 r1.27
  circle w0.254: c300,5 r1.27
  circle w0.254: c95,5 r1.27
  circle w0.254: c120,235 r1.27
  circle w0.254: c395,60 r1.27
  circle w0.254: c5,80 r1.27
  circle w0.254: c395,235 r1.27
  circle w0.254: c5.002,235 r1.27
  circle w0.254: c395,5.022 r1.27
  circle w0.254: c5.002,5.022 r1.27
  lines w0.254: -0.006,235 0.027,5.055 ; 0.002,5.022 ccw(c5.002,5.022) 5.002,0.022 395,0.022 ccw(c395,5.022) 400,5.022 ; 0.002,235 cw(c5.002,235) 5.002,240 395,240.003 ; 395,240 cw(c395,235) 400,235 400,5.055

## Other copper
Top Layer:
  rectangle net GND_-18V_2: 31.875,206.55 37.55,212.225

## Silkscreen, mask and mechanical layers (free items; w line width, h text height)
Top Overlay:
  circle w1: c240,150 r2
  circle w1: c395,150 r2
  circle w1: c40,150 r2
  circle w1: c280,235 r2
  circle w1: c300,5 r2
  circle w1: c120,235 r2
  circle w1: c395,60 r2
  circle w1: c5,80 r2
  circle w1: c95,5 r2
  circle w1: c395,235 r2
  circle w1: c395,5.022 r2
  circle w1: c5.002,5.022 r2
  circle w1: c5.002,235 r2
  lines w0.254: 40,168.838 40,167 43.136,167 ; 110,17.655 110,15 113.306,15
  text "+12" at 18.629,235.829 h1.2
  text "GND" at 18.479,232.254 h1.2
  text "VCC" at 1.104,127.696 h1.5 r270
  text "VCC" at 1.104,118.621 h1.5 r270
  text "GND" at 1.104,108.296 h1.5 r270
  text "GND" at 1.104,98.426 h1.5 r270
  text "NEUTRAL" at 398.096,95.329 h1.5 r90
  text "IN_DC" at 12.9,88.225 h3 r270
  text "VCC" at 398.096,87.879 h1.5 r90
  text "GND" at 398.146,76.629 h1.5 r90
Top Solder:
  lines w3: 21.6,184.05 44.275,206.725 200.4,206.725 209.52,197.605 209.52,197.454 ; 34.624,197.225 48.6,197.225 ; 42.675,51.5 75.425,18.75 121.025,18.75 128.775,11 140.964,11 ; 53.6,197.454 53.6,192.825 77.933,168.492 77.933,167.379 ; 59.8,125.2 59.8,144.725 ; 60.4,51.075 71.075,40.4 204.525,40.4 211.075,46.95 211.075,72.1 226.55,87.575 240.325,87.575 257.725,104.975 257.725,129.95 266.675,138.9 350.85,138.9 384.8,104.95 384.8,101.025 ; 71.52,197.454 71.52,188.28 78.05,181.75 78.05,123.975 ; 78.55,52.4 78.894,52.4 90.894,40.4 ; 94.52,197.454 94.52,170.205 95.85,168.875 95.85,161.487 ; 95.85,143.75 95.85,161.8 122.6,188.55 122.6,197.454 ; 108.329,206.725 117.52,197.534 117.52,197.454 ; 140.52,197.454 140.52,191.48 143.8,188.2 147.875,188.2 169.15,166.925 169.15,125.975 ; 151.375,144.7 151.375,124 152.3,123.075 ; 151.886,11 151.9,11 159.15,3.75 283.086,3.75 290.336,11 290.336,14.039 284.775,19.6 ; 151.925,52.425 151.925,49.075 160.312,40.688 ; 154.361,206.725 163.52,197.566 163.52,197.454 ; 168.575,167.501 168.575,197.2 ; 169.85,51 169.85,50.6 179.675,40.775 ; 186.357,143.036 186.357,162.957 214.6,191.2 214.6,197.454 ; 186.495,158.795 186.495,197.379 ; 197.886,4.08 197.886,11 ; 244.336,5.511 244.336,11 ; 256.425,11.25 256.25,11.25 226.275,41.225 226.275,59.675 234.725,68.125 270.375,68.125 ; 336.075,68.075 349.225,68.075 356.5,60.8 356.5,44.2 338.225,25.925 338.225,7.3 341.825,3.7 351.661,3.7 358.961,11 ; 348.039,11 369.475,32.436 369.475,84.825 374.25,89.6 380.175,89.6 ; 379.875,79.825 390.225,79.825 ; 379.875,99.72 379.957,99.802 389.863,99.802 ; 381.961,11 394.45,23.489 394.45,38.325 384.925,47.85 384.925,79.775
  lines w5: 19.35,97.1 19.35,106.65 19.25,106.55 9.1,106.55 9.1,96.85 9.2,96.75 24.725,96.75 42.6,114.625 42.6,131.375 20.833,153.142 20.833,214.817
Bottom Solder:
  lines w3: 10.425,199.925 10.65,199.7 28.575,199.7 39.3,188.975 53.625,188.975 56.225,186.375 71.079,186.375 ; 10.792,165.309 47.809,165.309 68.875,186.375 124.9,186.375 128.35,189.825 186.375,189.825 191.6,195.05 191.6,197.454 ; 42.5,55.725 42.5,48.475 72.175,18.8 121.1,18.8 128.9,11 140.964,11 ; 67.45,144.55 97.25,144.675 ; 76.45,186.375 76.6,186.525 76.6,197.454 ; 96.074,54.777 96.074,46.426 104.625,37.875 126.375,37.875 143.625,20.625 165.225,20.625 174.85,11 186.964,11 ; 99.45,186.725 99.6,186.875 99.6,197.454 ; 117.964,11 125.189,3.775 249.189,3.775 256.414,11 247.819,19.594 ; 133.525,52.45 133.525,52.125 151.225,34.425 179.275,34.425 195.2,18.5 213.65,18.5 221.25,10.9 233.05,10.9 ; 145.584,189.8 145.584,197.263 ; 158.55,144.5 188.05,144.35 ; 163.964,5.489 163.964,11 ; 187.5,54.325 187.5,46.2 195.375,38.325 215.325,38.325 219.225,34.425 243.875,34.425 267.4,10.9 278.825,10.9 279.225,11.3 ; 210.414,4.214 210.414,11
  lines w5: 9.275,115.675 9.275,136.025 10.8,137.55 10.8,153.15 10.792,153.158 10.792,214.998 ; 269.813,113.87 261.305,113.87 251.9,123.275 224.825,123.275 222.35,120.8 222.35,113.971 225.922,110.399 245.975,110.399 257.475,98.899 257.475,65.375 269.6,53.25 272.823,53.25 276.673,49.4 276.673,27.727 290.336,14.064 290.336,11 ; 335.8,108.65 336.25,109.1 363.325,109.1 368.925,103.5 368.925,13.114 371.039,11 ; 335.98,68.302 349.473,68.302 356.575,61.2 356.575,43.1 338.1,24.625 338.1,8.125 342.225,4 351.961,4 358.711,10.75 ; 381.961,11 385.825,11 394.675,19.85 394.675,37.85 383.5,49.025 383.5,73.15 390.275,79.925

## Text inside footprints (layer, text, board x,y; h text height)
DA1: Top Overlay "GND" at 325.818,232.695 h0.8 r270; Top Overlay "GND" at 312.918,232.695 h0.8 r270; Top Overlay "VCC" at 302.668,232.695 h0.8 r270; Top Overlay "AND" at 338.468,232.695 h0.8 r270; Top Overlay "CAT" at 340.818,232.695 h0.8 r270; Top Overlay "GND" at 310.479,232.695 h0.8 r270; Top Overlay "CAT_3" at 318.141,232.695 h0.8 r270; Top Overlay "AND_3" at 315.451,232.695 h0.8 r270; Top Overlay "AND_2" at 333.397,232.695 h0.8 r270; Top Overlay "CAT_2" at 335.747,232.695 h0.8 r270; Top Overlay "AND_1" at 328.503,232.695 h0.8 r270; Top Overlay "CAT_1" at 330.853,232.695 h0.8 r270; Top Overlay "AND_4" at 320.826,232.695 h0.8 r270; Top Overlay "CAT_4" at 323.176,232.695 h0.8 r270; Top Overlay "FB" at 305.463,232.695 h0.8 r270; Top Overlay "IS" at 307.813,232.695 h0.8 r270
U3: Top Overlay "-18V_1" at 249.115,231.766 h1.3 r270; Top Overlay "-18V_1" at 251.655,231.766 h1.3 r270; Top Overlay "+18V_1" at 254.195,231.766 h1.3 r270; Top Overlay "+18V_1" at 256.735,231.766 h1.3 r270; Top Overlay "+18V_2" at 213.555,232.045 h1.3 r270; Top Overlay "+18V_2" at 216.095,232.045 h1.3 r270; Top Overlay "-18V_2" at 218.635,232.045 h1.3 r270; Top Overlay "-18V_2" at 221.175,232.045 h1.3 r270; Top Overlay "+12V" at 238.522,230.949 h1.3 r270; Top Overlay "GND" at 230.902,230.309 h1.3 r270; Top Overlay "GND" at 233.442,230.309 h1.3 r270; Top Overlay "+12V" at 235.982,230.949 h1.3 r270; Bottom Overlay "+18V_2" at 213.764,235.485 h0.8 r270; Bottom Overlay "+18V_2" at 216.304,235.485 h0.8 r270; Bottom Overlay "-18V_2" at 218.844,235.485 h0.8 r270; Bottom Overlay "-18V_2" at 221.384,235.485 h0.8 r270; Bottom Overlay "GND" at 231.477,236.303 h0.8 r270; Bottom Overlay "GND" at 234.017,236.303 h0.8 r270; Bottom Overlay "+12V" at 236.557,235.909 h0.8 r270; Bottom Overlay "+12V" at 239.097,235.909 h0.8 r270; Bottom Overlay "-18V_1" at 249.374,235.456 h0.8 r270; Bottom Overlay "-18V_1" at 251.914,235.456 h0.8 r270; Bottom Overlay "+18V_1" at 254.454,235.456 h0.8 r270; Bottom Overlay "+18V_1" at 256.994,235.456 h0.8 r270
U4: Top Overlay "-18V_1" at 85.465,231.766 h1.3 r270; Top Overlay "-18V_1" at 88.005,231.766 h1.3 r270; Top Overlay "+18V_1" at 90.545,231.766 h1.3 r270; Top Overlay "+18V_1" at 93.085,231.766 h1.3 r270; Top Overlay "+18V_2" at 49.905,232.045 h1.3 r270; Top Overlay "+18V_2" at 52.445,232.045 h1.3 r270; Top Overlay "-18V_2" at 54.985,232.045 h1.3 r270; Top Overlay "-18V_2" at 57.525,232.045 h1.3 r270; Top Overlay "+12V" at 74.872,230.949 h1.3 r270; Top Overlay "GND" at 67.252,230.309 h1.3 r270; Top Overlay "GND" at 69.792,230.309 h1.3 r270; Top Overlay "+12V" at 72.332,230.949 h1.3 r270; Bottom Overlay "+18V_2" at 50.089,235.21 h0.8 r270; Bottom Overlay "+18V_2" at 52.629,235.21 h0.8 r270; Bottom Overlay "-18V_2" at 55.169,235.21 h0.8 r270; Bottom Overlay "-18V_2" at 57.709,235.21 h0.8 r270; Bottom Overlay "GND" at 67.777,235.928 h0.8 r270; Bottom Overlay "GND" at 70.317,235.928 h0.8 r270; Bottom Overlay "+12V" at 72.857,235.534 h0.8 r270; Bottom Overlay "+12V" at 75.397,235.534 h0.8 r270; Bottom Overlay "-18V_1" at 85.774,235.331 h0.8 r270; Bottom Overlay "-18V_1" at 88.314,235.331 h0.8 r270; Bottom Overlay "+18V_1" at 90.854,235.331 h0.8 r270; Bottom Overlay "+18V_1" at 93.394,235.331 h0.8 r270
U13: Top Overlay "-18V_1" at 167.19,231.766 h1.3 r270; Top Overlay "-18V_1" at 169.73,231.766 h1.3 r270; Top Overlay "+18V_1" at 172.27,231.766 h1.3 r270; Top Overlay "+18V_1" at 174.81,231.766 h1.3 r270; Top Overlay "+18V_2" at 131.63,232.045 h1.3 r270; Top Overlay "+18V_2" at 134.17,232.045 h1.3 r270; Top Overlay "-18V_2" at 136.71,232.045 h1.3 r270; Top Overlay "-18V_2" at 139.25,232.045 h1.3 r270; Top Overlay "+12V" at 156.597,230.949 h1.3 r270; Top Overlay "GND" at 148.977,230.309 h1.3 r270; Top Overlay "GND" at 151.517,230.309 h1.3 r270; Top Overlay "+12V" at 154.057,230.949 h1.3 r270; Bottom Overlay "+18V_2" at 131.789,235.31 h0.8 r270; Bottom Overlay "+18V_2" at 134.329,235.31 h0.8 r270; Bottom Overlay "-18V_2" at 136.869,235.31 h0.8 r270; Bottom Overlay "-18V_2" at 139.409,235.31 h0.8 r270; Bottom Overlay "GND" at 149.627,236.228 h0.8 r270; Bottom Overlay "GND" at 152.167,236.228 h0.8 r270; Bottom Overlay "+12V" at 154.707,235.834 h0.8 r270; Bottom Overlay "+12V" at 157.247,235.834 h0.8 r270; Bottom Overlay "-18V_1" at 167.474,235.406 h0.8 r270; Bottom Overlay "-18V_1" at 170.014,235.406 h0.8 r270; Bottom Overlay "+18V_1" at 172.554,235.406 h0.8 r270; Bottom Overlay "+18V_1" at 175.094,235.406 h0.8 r270